# Altium PCB BLDC-Driver-v2.0.PcbDoc (part 4 of 6)
Units mil, origin at the board's own origin, x right, y up, seen from the top; angles counter-clockwise.
Board outline 5905.51 x 4330.71 mil, 4 copper layers (Top Layer, Layer 1, Layer 2, Bottom Layer), stack 62.047 mil thick; 284 components, 198 nets, 819 pads, 521 vias.
Unrouted connection lines stored in the file: 1.
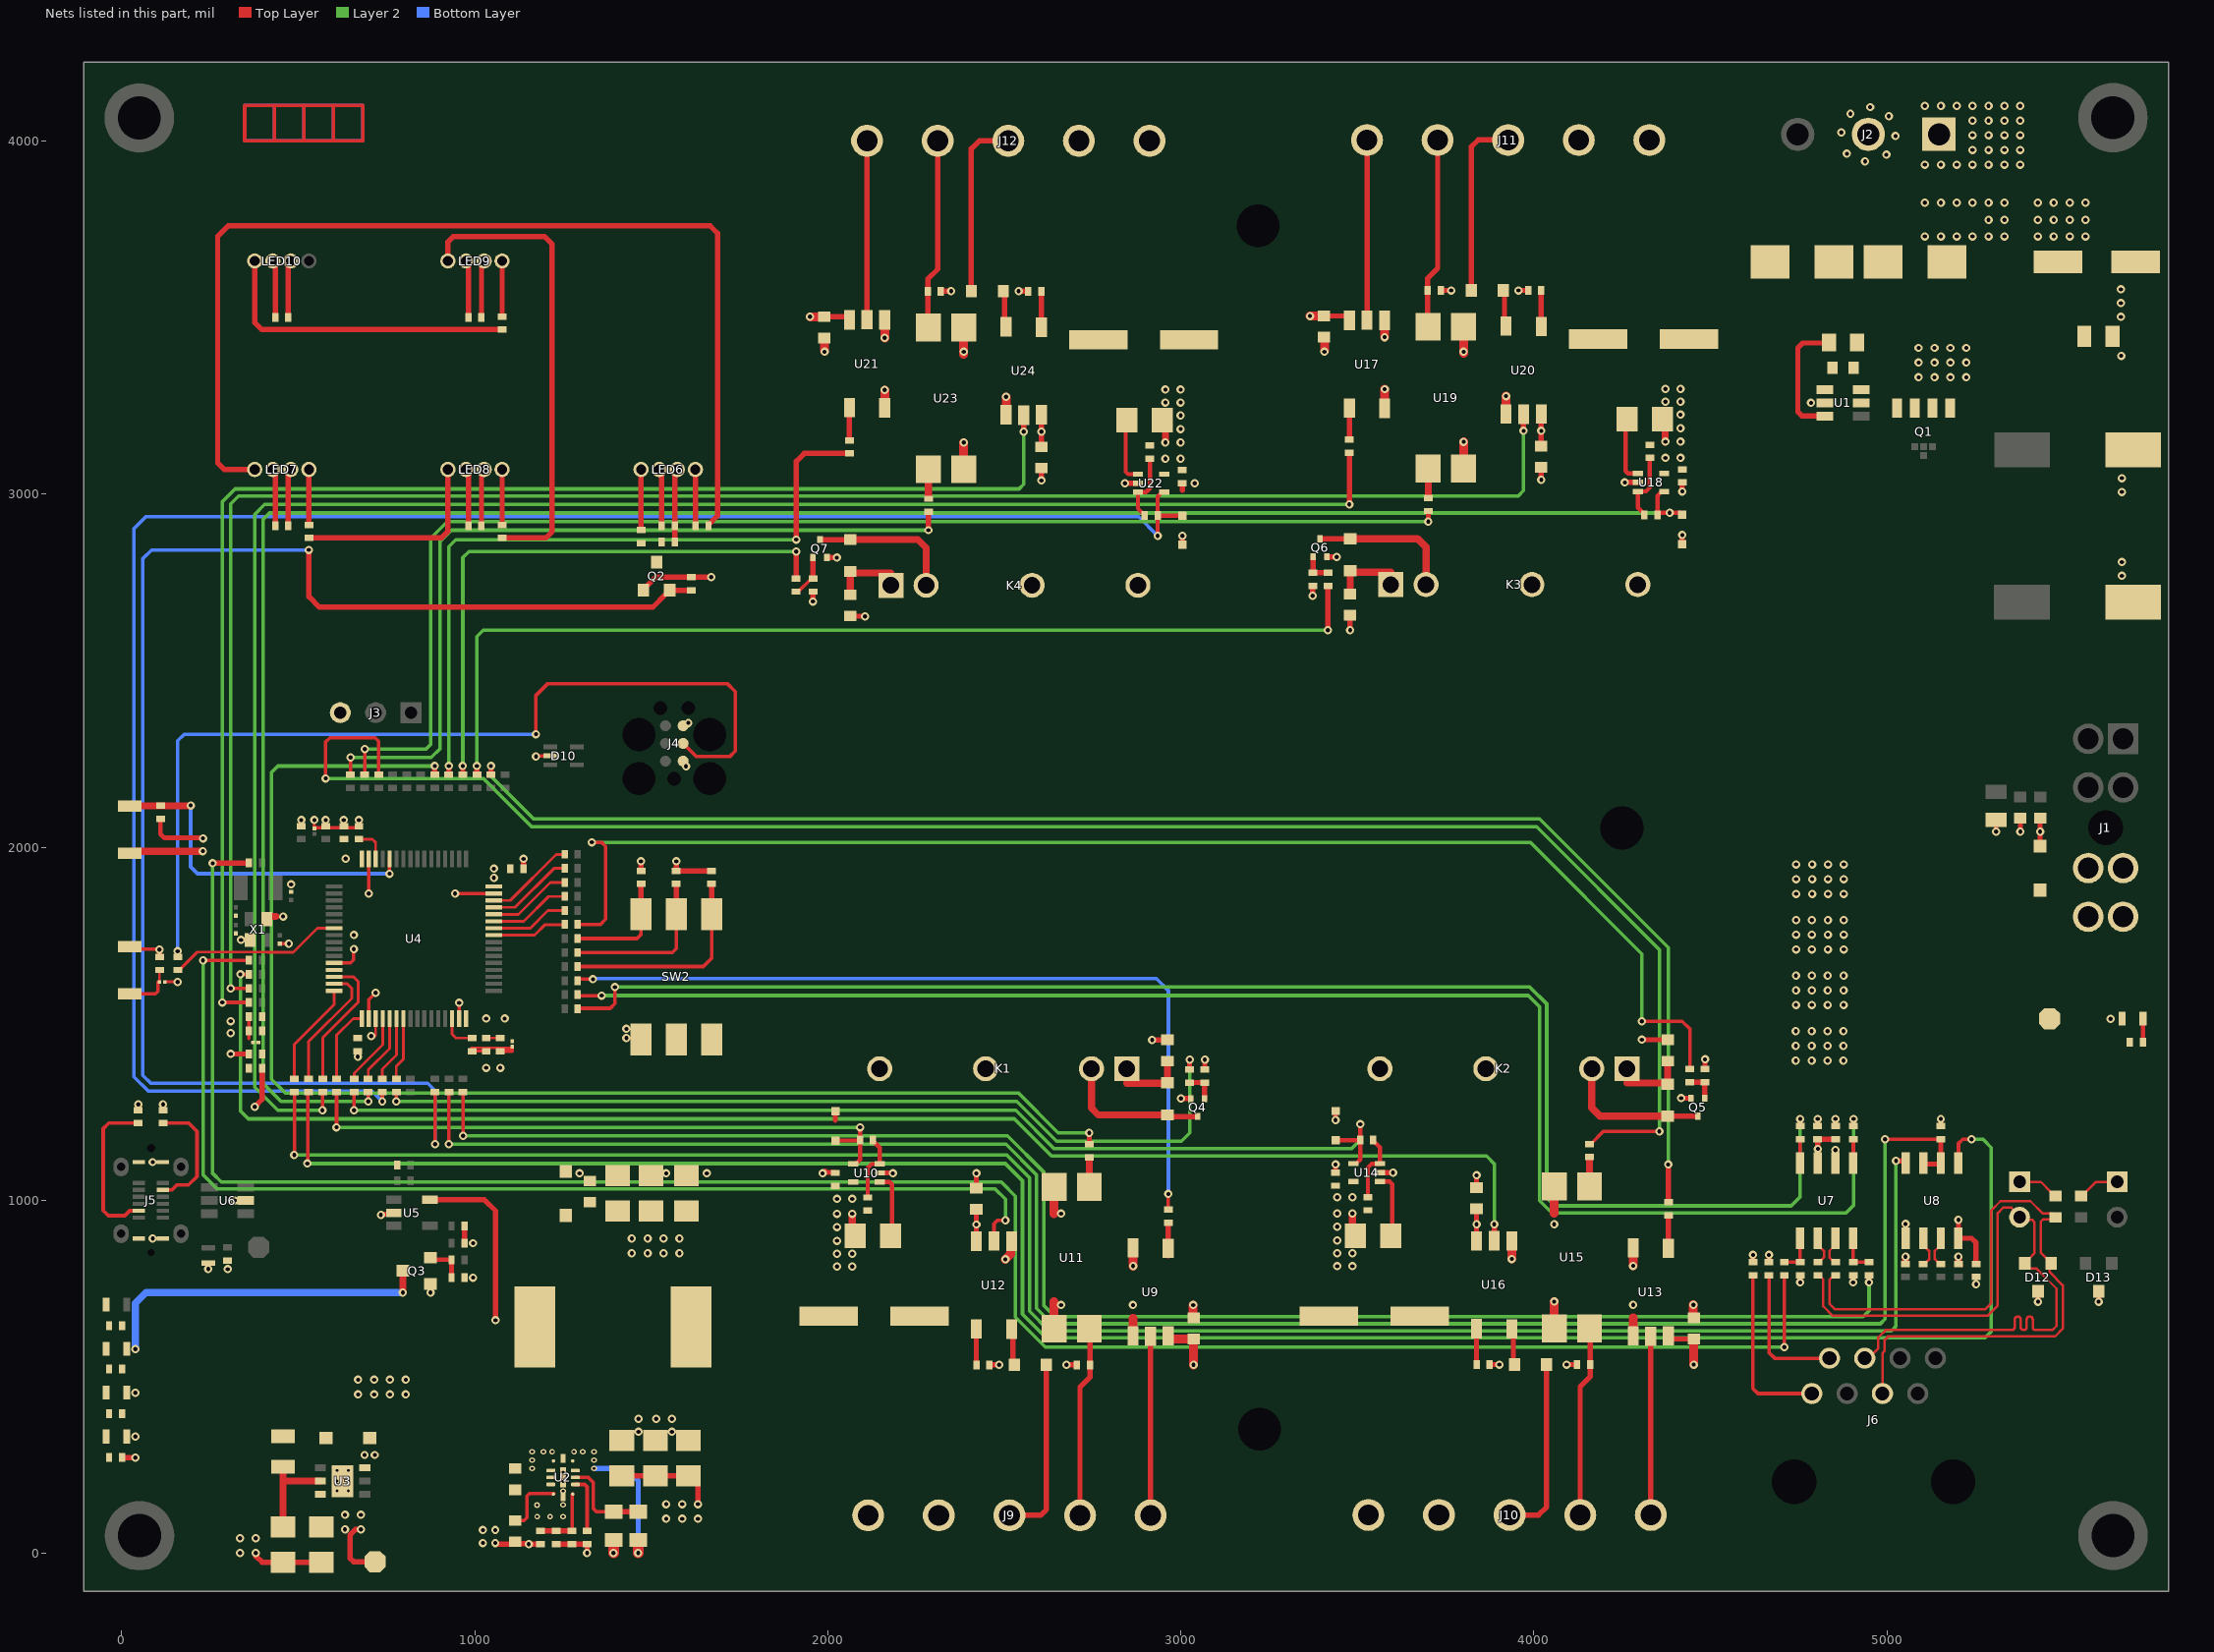
[diagram p4: the nets of this part, all layers, seen from the top]

## Part data (continued)
R70 R71: library part RC0402FR-075K1L, "RES 5.1K OHM 1% 1/16W 0402", Case Code (Imperial)=0402, Case Code (Metric)=1005, LCSC Part Number=C105872, Manufacturer=Yageo, Max Operating Temperature=155°C, Max Power Dissipation=63mW, Min Operating Temperature=-55°C, Package Quantity=1, Resistance=5.1kR, Resistance Tolerance=1%, Resistor Type="Thick Film", Temperature Coefficient=100ppm/°C, Voltage Rating=50V, Case/Package=0402, Category="Chip SMD Resistors", ComponentLink1Description=https://datasheet.ciiva.com/7983/1018594-7983519.pdf?src-supplier=Element14, ComponentLink1URL=https://datasheet.ciiva.com/7983/1018594-7983519.pdf?src-supplier=Element14, ComponentLink2Description=https://datasheet.ciiva.com/46394/1018594-46394936.pdf?src-supplier=Element14, ComponentLink2URL=https://datasheet.ciiva.com/46394/1018594-46394936.pdf?src-supplier=Element14, ComponentLink3Description=https://datasheet.ciiva.com/2453/pyu-r-int-thick-7-2453401.pdf?src-supplier=Digi-Key, ComponentLink3URL=https://datasheet.ciiva.com/2453/pyu-r-int-thick-7-2453401.pdf?src-supplier=Digi-Key, ComponentLink4Description=https://datasheet.ciiva.com/2453/pyu-r-int-thick-7-2453402.pdf?src-supplier=Digi-Key, ComponentLink4URL=https://datasheet.ciiva.com/2453/pyu-r-int-thick-7-2453402.pdf?src-supplier=Digi-Key, ComponentLink5Description=https://datasheet.ciiva.com/2453/pyu-r-int-thick-7-2453400.pdf?src-supplier=Digi-Key, ComponentLink5URL=https://datasheet.ciiva.com/2453/pyu-r-int-thick-7-2453400.pdf?src-supplier=Digi-Key, ComponentLink6Description=https://datasheet.ciiva.com/12558/pyu-rc0402-51-rohs-l-6-r-8721-12558460.pdf?src-supplier=Mouser, ComponentLink6URL=https://datasheet.ciiva.com/12558/pyu-rc0402-51-rohs-l-6-r-8721-12558460.pdf?src-supplier=Mouser, ComponentLink7Description=https://datasheet.ciiva.com/16744/pyu-rc0402-51-rohs-l-6-r-16744283.pdf?src-supplier=Future+Electronics, ComponentLink7URL=https://datasheet.ciiva.com/16744/pyu-rc0402-51-rohs-l-6-r-16744283.pdf?src-supplier=Future+Electronics, ComponentLink8Description=https://datasheet.ciiva.com/15189/getdatasheetpartid-323636-15189493.pdf?src-supplier=Verical, ComponentLink8URL=https://datasheet.ciiva.com/15189/getdatasheetpartid-323636-15189493.pdf?src-supplier=Verical, Construction=Rectangular, Depth=0.5mm, Features="Moisture Resistant", Height=0.016inch, Item Type=Resistor, Lead Free="Lead Free", Length=1mm, Manufacturer Part Number=RC0402FR-075K1L, Military Standard=Not, Number of Terminations=2, Packaging="Tape and Reel", Power Rating=63mW, Pricing 1="10000=0.00085 (USD)", RoHS=Yes, RoHS Compliant=Yes, Series=RC, Stock 1=65000, Supplier 1=Avnet, Supplier Part Number 1=RC0402FR-075K1L, Technology="THICK FILM", Termination=SMD/SMT, Tolerance=1%, Voltage Rating (DC)=50V, Width=0.02inch, Working Voltage=50V
R81 R86: library part RC0603FR-07120RL, "RES 120 OHM 1% 1/10W 0603", Case Code (Imperial)=0603, Case Code (Metric)=1608, LCSC Part Number=C114640, Manufacturer=Yageo, Max Operating Temperature=155°C, Max Power Dissipation=100mW, Min Operating Temperature=-55°C, Package Quantity=1, Resistance Tolerance=1%, Resistor Type="Thick Film", Supplier Part Number 1=311-120HRCT-ND, Temperature Coefficient=100ppm/°C, Voltage Rating=50V, Case/Package=0603, Category="Chip SMD Resistors", ComponentLink1Description=https://datasheet.ciiva.com/2553/pyu-r-int-thick-7-2553512.pdf?src-supplier=Digi-Key, ComponentLink1URL=https://datasheet.ciiva.com/2553/pyu-r-int-thick-7-2553512.pdf?src-supplier=Digi-Key, ComponentLink2Description=https://datasheet.ciiva.com/7746/443971-7746248.pdf?src-supplier=Element14, ComponentLink2URL=https://datasheet.ciiva.com/7746/443971-7746248.pdf?src-supplier=Element14, ComponentLink3Description=https://datasheet.ciiva.com/2553/pyu-r-int-thick-7-2553513.pdf?src-supplier=Digi-Key, ComponentLink3URL=https://datasheet.ciiva.com/2553/pyu-r-int-thick-7-2553513.pdf?src-supplier=Digi-Key, ComponentLink4Description=https://datasheet.ciiva.com/7746/443971-7746249.pdf?src-supplier=Element14, ComponentLink4URL=https://datasheet.ciiva.com/7746/443971-7746249.pdf?src-supplier=Element14, ComponentLink5Description=https://datasheet.ciiva.com/2553/pyu-r-int-thick-7-2553514.pdf?src-supplier=Digi-Key, ComponentLink5URL=https://datasheet.ciiva.com/2553/pyu-r-int-thick-7-2553514.pdf?src-supplier=Digi-Key, ComponentLink6Description=https://datasheet.ciiva.com/46395/443971-46395021.pdf?src-supplier=Element14, ComponentLink6URL=https://datasheet.ciiva.com/46395/443971-46395021.pdf?src-supplier=Element14, Construction=Rectangular, Depth=0.8mm, Features="Moisture Resistant", Height=0.022inch, Item Type=Resistor, Lead Free="Lead Free", Length=1.6mm, Manufacturer Part Number=RC0603FR-07120RL, Military Standard=Not, Number of Pins=2, Number of Terminations=2, Packaging="Tape and Reel", Power Rating=100mW, Pricing 1="1=0.10000, 10=0.02400, 100=0.00970, 1000=0.00436, 2500=0.00378 (USD)", REACH SVHC="No SVHC", Resistance=120R, RoHS=Yes, RoHS Compliant=Yes, Series=RC, Size Code=0603, Stock 1=839061, Supplier 1=Digi-Key, Termination=SMD/SMT, Tolerance=1%, Voltage Rating (DC)=50V, Width=0.031inch
R91 R94 R100 R103 R109 R112 R118 R121: library part RC0402FR-07470RL, "RES 470 OHM 1% 1/16W 0402", Case Code (Imperial)=0402, Case Code (Metric)=1005, LCSC Part Number=C114877, Manufacturer=Yageo, Max Operating Temperature=155°C, Max Power Dissipation=63mW, Min Operating Temperature=-55°C, Package Quantity=1, Power Rating=62.5mW, Resistance Tolerance=1%, Resistor Type="Thick Film", Temperature Coefficient=100ppm/°C, Voltage Rating=50V, Case/Package=0402, ComponentLink1Description=https://datasheet.ciiva.com/46412/1018594-46412838.pdf?src-supplier=Element14, ComponentLink1URL=https://datasheet.ciiva.com/46412/1018594-46412838.pdf?src-supplier=Element14, ComponentLink2Description=https://datasheet.ciiva.com/2453/pyu-r-int-thick-7-2453377.pdf?src-supplier=Digikey, ComponentLink2URL=https://datasheet.ciiva.com/2453/pyu-r-int-thick-7-2453377.pdf?src-supplier=Digikey, ComponentLink3Description=https://datasheet.ciiva.com/2453/pyu-r-int-thick-7-2453378.pdf?src-supplier=Digikey, ComponentLink3URL=https://datasheet.ciiva.com/2453/pyu-r-int-thick-7-2453378.pdf?src-supplier=Digikey, ComponentLink4Description=https://datasheet.ciiva.com/2453/pyu-r-int-thick-7-2453376.pdf?src-supplier=Digikey, ComponentLink4URL=https://datasheet.ciiva.com/2453/pyu-r-int-thick-7-2453376.pdf?src-supplier=Digikey, ComponentLink5Description=https://datasheet.ciiva.com/7850/1018594-7850015.pdf?src-supplier=Element14, ComponentLink5URL=https://datasheet.ciiva.com/7850/1018594-7850015.pdf?src-supplier=Element14, ComponentLink6Description=https://datasheet.ciiva.com/7850/1018594-7850014.pdf?src-supplier=Element14, ComponentLink6URL=https://datasheet.ciiva.com/7850/1018594-7850014.pdf?src-supplier=Element14, ComponentLink7Description=https://datasheet.ciiva.com/15189/getdatasheetpartid-330246-15189463.pdf?src-supplier=Verical, ComponentLink7URL=https://datasheet.ciiva.com/15189/getdatasheetpartid-330246-15189463.pdf?src-supplier=Verical, Construction=Rectangular, Depth=0.5mm, Features="Moisture Resistant", Height=0.016inch, Item Type=Resistor, Lead Free="Lead Free", Length=1mm, Manufacturer Part Number=RC0402FR-07470RL, Military Standard=Not, Number of Terminations=2, Packaging="Tape and Reel", Pricing="10000=0.00085 (USD)", Reach SVHC Compliant=No, RoHS=Yes, RoHS Compliant=Yes, Series=RC, Stock=10000, Supplier=Avnet, Supplier Part Number=RC0402FR-07470RL, Termination=SMD/SMT, Tolerance=1%, Voltage Rating (AC)=50V, Width=0.02inch, Working Voltage=50V
R93 R102 R111 R120: library part LR1206-21R040F4, "1W 40mΩ Surface Mount Current Sensing Resistors ±50ppm/℃ ±1% 1206 Current Sense Resistors/Shunt Resistors ROHS", LCSC Part Number=C2681030, Manufacturer=RALEC, Package=1206, ComponentLink1Description=LCSC, ComponentLink1URL=https://www.lcsc.com/product-detail/Current-Sense-Resistors-Shunt-Resistors_RALEC-LR1206-21R040F4_C2681030.html, Item Type=Resistor, Manufacturer Part Number=LR1206-21R040F4
R95 R104 R113 R122: library part RT0402BRD0736KL, "RES SMD 36K OHM 0.1% 1/16W 0402", Case Code (Imperial)=0402, Case Code (Metric)=1005, LCSC Part Number=C852742, Manufacturer=Yageo, Max Operating Temperature=155°C, Max Power Dissipation=63mW, Min Operating Temperature=-55°C, Power Rating=62.5mW, Temperature Coefficient=25ppm/°C, Tolerance=0.1%, Voltage Rating=50V, Case/Package=0402, Category="Chip SMD Resistors", ComponentLink1Description=https://datasheet.ciiva.com/12722/pyu-rt-1-to-0-05-rohs-l-4-12722329.pdf?src-supplier=Mouser, ComponentLink1URL=https://datasheet.ciiva.com/12722/pyu-rt-1-to-0-05-rohs-l-4-12722329.pdf?src-supplier=Mouser, Features="Moisture Resistant", Height=0.014inch, Item Type=Resistor, Lead Free="Lead Free", Length=0.039inch, Manufacturer Part Number=RT0402BRD0736KL, Number of Terminations=2, Packaging="Tape and Reel", Pricing="1=0.3205, 10=0.2411, 25=0.2387, 100=0.1111, 250=0.1093, 500=0.0738, 1000=0.0507, 3000=0.0463, 6000=0.0439 (USD)", RoHS=Yes, RoHS Compliant=Yes, Series=RT, Stock=6118, Supplier="Arrow Electronics", Supplier Part Number=RT0402BRD0736KL, Termination=SMD/SMT, Voltage Rating (DC)=50V, Width=0.02inch
R97 R106 R115 R124: library part RC0402FR-07680RL, "RES 680 OHM 1% 1/16W 0402", Case Code (Imperial)=0402, Case Code (Metric)=1005, Manufacturer=Yageo, Max Operating Temperature=155°C, Max Power Dissipation=63mW, Min Operating Temperature=-55°C, Resistance Tolerance=1%, Resistor Type="Thick Film", Supplier Part Number 1=7948052, Temperature Coefficient=100ppm/°C, Voltage Rating=50V, Case/Package=0402, Category="Chip SMD Resistors", ComponentLink1Description=https://datasheet.ciiva.com/12667/pyu-rc0402-51-rohs-l-6-r-12667916.pdf?src-supplier=Mouser, ComponentLink1URL=https://datasheet.ciiva.com/12667/pyu-rc0402-51-rohs-l-6-r-12667916.pdf?src-supplier=Mouser, ComponentLink2Description=https://datasheet.ciiva.com/7850/1018594-7850071.pdf?src-supplier=Element14, ComponentLink2URL=https://datasheet.ciiva.com/7850/1018594-7850071.pdf?src-supplier=Element14, ComponentLink3Description=https://datasheet.ciiva.com/7850/1018594-7850070.pdf?src-supplier=Element14, ComponentLink3URL=https://datasheet.ciiva.com/7850/1018594-7850070.pdf?src-supplier=Element14, ComponentLink4Description=https://datasheet.ciiva.com/17042/pyu-rc0402-51-rohs-l-6-r-17042399.pdf?src-supplier=Future+Electronics, ComponentLink4URL=https://datasheet.ciiva.com/17042/pyu-rc0402-51-rohs-l-6-r-17042399.pdf?src-supplier=Future+Electronics, Construction=Rectangular, Depth=0.5mm, Features="Moisture Resistant", Item Type=Resistor, Lead Free="Lead Free", Length=1mm, Manufacturer Part Number=RC0402FR-07680RL, Military Standard=Not, Number of Terminations=2, Packaging="Tape and Reel", Power Rating=63mW, Pricing 1="10000=0.0011, 100000=0.0011, 300000=0.001, 750000=0.001, 2000000=0.0009 (USD)", Reach SVHC Compliant=No, Resistance=680R, RoHS=Yes, RoHS Compliant=Yes, Series=RC, Size Code=0402, Stock 1=5080000, Supplier 1="Future Electronics", Termination=SMD/SMT, Tolerance=1%, Voltage Rating (AC)=50V
R99 R108 R117 R126: library part RT0402BRD071K65L, "RES SMD 1.65KOHM 0.1% 1/16W 0402", LCSC Part Number=C852615, Manufacturer=Yageo, ComponentLink1Description=https://datasheet.ciiva.com/2582/pyu-rt-1-to-0-05-rohs-l-5-2582209.pdf?src-supplier=Digikey, ComponentLink1URL=https://datasheet.ciiva.com/2582/pyu-rt-1-to-0-05-rohs-l-5-2582209.pdf?src-supplier=Digikey, Item Type=Resistors, Manufacturer Part Number=RT0402BRD071K65L, Pricing="10000=0.0185, 20000=0.0182, 30000=0.0181, 40000=0.018, 50000=0.0176 (USD)", RoHS=Yes, Stock=10000, Supplier="Future Electronics"
R127 R128: library part RC0402FR-07560RL, "RES 560 OHM 1% 1/16W 0402", Case Code (Imperial)=0402, Case Code (Metric)=1005, LCSC Part Number=C163460, Manufacturer=Yageo, Max Operating Temperature=155°C, Max Power Dissipation=63mW, Min Operating Temperature=-55°C, Package Quantity=1, Resistance Tolerance=1%, Resistor Type="Thick Film", Supplier Part Number=8872046, Temperature Coefficient=100ppm/°C, Voltage Rating=50V, Case/Package=0402, Category="Chip SMD Resistors", ComponentLink1Description=https://datasheet.ciiva.com/2453/pyu-r-int-thick-7-2453458.pdf?src-supplier=Digikey, ComponentLink1URL=https://datasheet.ciiva.com/2453/pyu-r-int-thick-7-2453458.pdf?src-supplier=Digikey, ComponentLink2Description=https://datasheet.ciiva.com/2453/pyu-r-int-thick-7-2453459.pdf?src-supplier=Digikey, ComponentLink2URL=https://datasheet.ciiva.com/2453/pyu-r-int-thick-7-2453459.pdf?src-supplier=Digikey, ComponentLink3Description=https://datasheet.ciiva.com/2453/pyu-r-int-thick-7-2453457.pdf?src-supplier=Digikey, ComponentLink3URL=https://datasheet.ciiva.com/2453/pyu-r-int-thick-7-2453457.pdf?src-supplier=Digikey, ComponentLink4Description=https://datasheet.ciiva.com/12558/pyu-rc0402-51-rohs-l-6-r-8721-12558383.pdf?src-supplier=Mouser, ComponentLink4URL=https://datasheet.ciiva.com/12558/pyu-rc0402-51-rohs-l-6-r-8721-12558383.pdf?src-supplier=Mouser, ComponentLink5Description=https://datasheet.ciiva.com/7850/1018594-7850042.pdf?src-supplier=Element14, ComponentLink5URL=https://datasheet.ciiva.com/7850/1018594-7850042.pdf?src-supplier=Element14, ComponentLink6Description=https://datasheet.ciiva.com/7850/1018594-7850043.pdf?src-supplier=Element14, ComponentLink6URL=https://datasheet.ciiva.com/7850/1018594-7850043.pdf?src-supplier=Element14, Construction=Rectangular, Depth=0.5mm, Features="Moisture Resistant", Height=0.016inch, Item Type=Resistor, Lead Free="Lead Free", Length=1mm, Manufacturer Part Number=RC0402FR-07560RL, Military Standard=Not, Number of Terminations=2, Packaging="Tape and Reel", Power Rating=63mW, Pricing="10000=0.0012, 100000=0.0011, 300000=0.0011, 1250000=0.001, 3000000=0.0009 (USD)", Reach SVHC Compliant=Unknown, RoHS=Yes, RoHS Compliant=Yes, Series=RC, Stock=1360000, Supplier="Future Electronics", Termination=SMD/SMT, Tolerance=1%, Width=0.02inch
SW1 SW3: "SWITCH TACTILE SPST-NO 0.05A 12V", Contact Current Rating=50mA, Contact Resistance=100mR, Insulation Resistance=100MR, LCSC Part Number=C231329, Manufacturer=Omron, Max Operating Temperature=70°C, Max Voltage Rating (DC)=12V, Min Operating Temperature=-25°C, Operating Force=1.5N, Package Quantity=1, Ratings="Dust Proof,IP40", Supplier Part Number 1=SW1020DKR-ND, Actuator Length=0.4mm, Actuator Type=Standard, ComponentLink1Description=http://www.farnell.com/datasheets/60838.pdf?src-supplier=Farnell, ComponentLink1URL=http://www.farnell.com/datasheets/60838.pdf?src-supplier=Farnell, ComponentLink2Description=http://www.farnell.com/datasheets/60838.pdf?src-supplier=Element14, ComponentLink2URL=http://www.farnell.com/datasheets/60838.pdf?src-supplier=Element14, ComponentLink3Description=https://omronfs.omron.com/en_US/ecb/products/pdf/en-b3u.pdf?src-supplier=Digi-Key, ComponentLink3URL=https://omronfs.omron.com/en_US/ecb/products/pdf/en-b3u.pdf?src-supplier=Digi-Key, ComponentLink4Description=http://www.omron.com/ecb/products/pdf/en-b3u.pdf?src-supplier=Digi-Key, ComponentLink4URL=http://www.omron.com/ecb/products/pdf/en-b3u.pdf?src-supplier=Digi-Key, ComponentLink5Description=https://www.distrelec.biz/Web/Downloads/he/et/B3U_eng_datasheet.pdf?mime=application%2Fpdf&src-supplier=Distrelec, ComponentLink5URL=https://www.distrelec.biz/Web/Downloads/he/et/B3U_eng_datasheet.pdf?mime=application%2Fpdf&src-supplier=Distrelec, ComponentLink6Description=http://www.onlinecomponents.com/productFiles/mf-OM/en-b3u.pdf?src-supplier=Onlinecomponents.com, ComponentLink6URL=http://www.onlinecomponents.com/productFiles/mf-OM/en-b3u.pdf?src-supplier=Onlinecomponents.com, ComponentLink7Description=https://www.verical.com/server-webapp/html/getDatasheet?partID=552554&src-supplier=Verical, ComponentLink7URL=https://www.verical.com/server-webapp/html/getDatasheet?partID=552554&src-supplier=Verical, ComponentLink8Description=http://www.farnell.com/datasheets/1685550.pdf?src-supplier=Element14, ComponentLink8URL=http://www.farnell.com/datasheets/1685550.pdf?src-supplier=Element14, ComponentLink9Description=http://www.farnell.com/datasheets/2610940.pdf?src-supplier=Farnell, ComponentLink9URL=http://www.farnell.com/datasheets/2610940.pdf?src-supplier=Farnell, ComponentLink10Description=https://www.alliedelec.com/m/d/4c8a9ef82804fc3c241a13c1e298fd73.pdf?src-supplier=Allied+Electronics, ComponentLink10URL=https://www.alliedelec.com/m/d/4c8a9ef82804fc3c241a13c1e298fd73.pdf?src-supplier=Allied+Electronics, Contact Material=Silver, Current Rating=50mA, Depth=2.5mm, Electrical Life=200000Cycles, Height=1.2mm, Illumination Type=Non-Illuminated,Illuminated, Item Type=Switch, Lead Free="Lead Free", Length=4mm, Manufacturer Part Number=B3U-1000P, Max Current Rating=50mA, Mechanical Life=200000Cycles, Mount="Surface Mount", Orientation=Straight, Packaging="Tape and Reel", Pricing 1="1=1, 10=0.961, 25=0.9064, 50=0.7976, 100=0.7251, 250=0.68888, 500=0.67074, 1000=0.52571 (USD)", REACH SVHC=Unknown, Stock 1=116454, Supplier 1=Digi-Key, Switch Function=Off-Mom, Switch Travel=0.15mm, Termination=SMD/SMT, Throw Configuration=SPST, Voltage Rating (DC)=12V, Weight=0.000776oz, Width=3mm
SW2: "3 positions SPST Black Flat Toggle, Raised Style SMD-6P,6x7.6mm DIP Switches ROHS", LCSC Part Number=C57453, Manufacturer="DongGuan KINGTEK Industrial Co.,LTD", Package=SMD-6P,6x7.6mm, ComponentLink1Description=LCSC, ComponentLink1URL=https://www.lcsc.com/product-detail/DIP-Switches_DongGuan-KINGTEK-Industrial-Co-LTD-DSIC03LSGET_C57453.html, Item Type="DIP Switches", Manufacturer Part Number=DSIC03LSGET
TP1 TP2 TP3: "Test Point ON", Item Type="TEST POINT"
U1: "OR Controller N+1 ORing Controller N-Channel 1:1 SOT-23-6", Case/Package=SOT-23-6, LCSC Part Number=C2941042, Manufacturer="Texas Instruments", Max Operating Temperature=125°C, Max Output current=5A, Max Supply Voltage=65V, Min Operating Temperature=-40°C, Min Supply Voltage=3.2V, Nominal Supply Current=80uA, Supplier Part Number=595-LM74700QDBVRQ1, Category="Power Management ICs", ComponentLink1Description=http://www.ti.com/general/docs/suppproductinfo.tsp?distId=10&amp;gotoUrl=http%3A%2F%2Fwww.ti.com%2Flit%2Fgpn%2Flm74700-q1&src-supplier=Digikey, ComponentLink1URL=http://www.ti.com/general/docs/suppproductinfo.tsp?distId=10&amp;gotoUrl=http%3A%2F%2Fwww.ti.com%2Flit%2Fgpn%2Flm74700-q1&src-supplier=Digikey, Height=1.45mm, Item Type=IC, Length=2.9mm, Manufacturer Part Number=LM74700QDBVRQ1, Mounting Technology="Surface Mount", Number of Outputs=1NUMBER, Pins=6NUMBER, Pricing="1=1.78, 10=1.6, 50=1.6, 100=1.28, 1000=0.877, 10000=0.756 (USD)", RoHS=Yes, RoHS Compliant=Yes, Series="Automotive, AEC-Q100", Stock=11505, Supplier=Mouser, Thickness=1.2mm, Turn-Off Delay Time=450ns, Turn-On Delay Time=1.4us, Width=1.6mm
U2: "IC REG BUCK ADJ 4A 13WQFN", LCSC Part Number=C3187981, Manufacturer="Texas Instruments", Item Type=IC, Manufacturer Part Number=LM60440AQRPKRQ1, Pricing="1=2.79, 10=1.91, 50=1.91, 100=1.71, 1000=1.52, 10000=1.45 (USD)", RoHS=Yes, Stock=916, Supplier=Mouser
U3: "IC REG LINEAR 3.3V 1.3A 6DFN", LCSC Part Number=C283488, Manufacturer=STMicroelectronics, ComponentLink1Description=https://datasheet.ciiva.com/2053/cd00186925-2053848.pdf?src-supplier=Digikey, ComponentLink1URL=https://datasheet.ciiva.com/2053/cd00186925-2053848.pdf?src-supplier=Digikey, ComponentLink2Description=https://datasheet.ciiva.com/2053/cd00186925-2053849.pdf?src-supplier=Digikey, ComponentLink2URL=https://datasheet.ciiva.com/2053/cd00186925-2053849.pdf?src-supplier=Digikey, ComponentLink3Description=https://datasheet.ciiva.com/2053/cd00186925-2053850.pdf?src-supplier=Digikey, ComponentLink3URL=https://datasheet.ciiva.com/2053/cd00186925-2053850.pdf?src-supplier=Digikey, ComponentLink4Description=https://datasheet.ciiva.com/16489/cd00186925-16489850.pdf?src-supplier=Future+Electronics, ComponentLink4URL=https://datasheet.ciiva.com/16489/cd00186925-16489850.pdf?src-supplier=Future+Electronics, Item Type=IC, Manufacturer Part Number=ST1L05APU33R, Pricing="1=1.06, 10=0.766, 25=0.692, 100=0.6103, 250=0.57136, 500=0.5479, 1000=0.5286 (USD)", RoHS=Yes, Stock=7599, Supplier=Digikey
U4: "IC MCU 32BIT 128KB FLASH 64LQFP", LCSC Part Number=C6807804, Manufacturer=STMicroelectronics, Item Type=IC, Manufacturer Part Number=STM32H503RBT6, Pricing="1=3.75, 10=2.6, 50=2.6, 100=2.28, 1000=2.09, 10000=1.98 (USD)", RoHS=No, Stock=991, Supplier=Mouser
U5: "IC PWR SWITCH N-CHAN 1:1 SOT23-5", Drain to Source Resistance=90mR, LCSC Part Number=C361034, Manufacturer=STMicroelectronics, Max Supply Voltage=5.5V, Min Supply Voltage=2.7V, Nominal Supply Voltage=5V, ComponentLink1Description=https://datasheet.ciiva.com/4923/cd00167470-116695-4923505.pdf?src-supplier=Mouser, ComponentLink1URL=https://datasheet.ciiva.com/4923/cd00167470-116695-4923505.pdf?src-supplier=Mouser, ComponentLink2Description=https://datasheet.ciiva.com/15108/getdatasheetpartid-66027-15108935.pdf?src-supplier=Verical, ComponentLink2URL=https://datasheet.ciiva.com/15108/getdatasheetpartid-66027-15108935.pdf?src-supplier=Verical, ComponentLink3Description=https://datasheet.ciiva.com/1962/cd00167470-1962487.pdf?src-supplier=Digikey, ComponentLink3URL=https://datasheet.ciiva.com/1962/cd00167470-1962487.pdf?src-supplier=Digikey, ComponentLink4Description=https://datasheet.ciiva.com/1962/cd00167470-1962488.pdf?src-supplier=Digikey, ComponentLink4URL=https://datasheet.ciiva.com/1962/cd00167470-1962488.pdf?src-supplier=Digikey, ComponentLink5Description=https://datasheet.ciiva.com/1962/cd00167470-1962489.pdf?src-supplier=Digikey, ComponentLink5URL=https://datasheet.ciiva.com/1962/cd00167470-1962489.pdf?src-supplier=Digikey, ComponentLink6Description=https://datasheet.ciiva.com/1512/1700527-1512630.pdf?src-supplier=Element14, ComponentLink6URL=https://datasheet.ciiva.com/1512/1700527-1512630.pdf?src-supplier=Element14, ComponentLink7Description=https://datasheet.ciiva.com/16491/cd00167470-16491224.pdf?src-supplier=Future+Electronics, ComponentLink7URL=https://datasheet.ciiva.com/16491/cd00167470-16491224.pdf?src-supplier=Future+Electronics, ComponentLink8Description=https://datasheet.ciiva.com/41457/001185713-da-01-en-ic-pwr-switch-stmps2161str-sot-23-5-stm-41457482.pdf?src-supplier=Conrad, ComponentLink8URL=https://datasheet.ciiva.com/41457/001185713-da-01-en-ic-pwr-switch-stmps2161str-sot-23-5-stm-41457482.pdf?src-supplier=Conrad, Height=1.45mm, Item Type=IC, Manufacturer Part Number=STMPS2161STR, Number of Channels=1NUMBER, Output Voltage=5V, Pricing="3000=0.42, 6000=0.41, 9000=0.405, 12000=0.405, 15000=0.395 (USD)", RoHS=Yes, Stock=3000, Supplier="Future Electronics"
U6: "6A 12V 150W 6V Unidirectional 5V SOT-23-6 ESD and Surge Protection (TVS/ESD) ROHS", LCSC Part Number=C2827654, Manufacturer="TECH PUBLIC", Package=SOT-23-6, ComponentLink1Description=LCSC, ComponentLink1URL=https://www.lcsc.com/product-detail/ESD-and-Surge-Protection-TVS-ESD_TECH-PUBLIC-USBLC6-2SC6_C2827654.html, Item Type=(TVS/ESD), Manufacturer Part Number=USBLC6-2SC6
U7: "IC TRANSCEIVER HALF 1/1 8SOIC", Case/Package=SOIC, LCSC Part Number=C22396693, Manufacturer="Texas Instruments", Height=1.75mm, Item Type=IC, Length=4.9mm, Manufacturer Part Number=TCAN3414DR, Pins=8, Pricing="1=1.55, 10=1.1, 50=1.1, 100=0.895, 1000=0.763, 10000=0.681 (USD)", RoHS=No, Stock=201, Supplier=Mouser, Thickness=1.58mm, Width=3.91mm
U8: "IC TRANSCEIVER HALF 1/1 8SOIC", LCSC Part Number=C3235059, Manufacturer="Texas Instruments", Item Type=IC, Manufacturer Part Number=THVD1449DR, Pricing="1=3.62, 10=2.51, 50=2.51, 100=2.27, 1000=2.02, 10000=1.95 (USD)", RoHS=No, Stock=7454, Supplier=Mouser
U9 U12 U13 U16 U17 U20 U21 U24: "15Mbit/s 80ns 2.7V~5.5V 20kV/us DC SO-5 Logic Output Optoisolators ROHS", LCSC Part Number=C107626, Manufacturer=Toshiba, ComponentLink1Description=https://datasheet.octopart.com/TLP2361%28TPL%2CE%28T-Toshiba-datasheet-62094047.pdf?src-supplier=TME, ComponentLink1URL=https://datasheet.octopart.com/TLP2361%28TPL%2CE%28T-Toshiba-datasheet-62094047.pdf?src-supplier=TME, Item Type=Optoisolator, Manufacturer Part Number=TLP2361(TPL,E(T, Pricing="3000=0.3233, 6000=0.3199, 9000=0.3167, 12000=0.3136, 15000=0.3102, 30000=0.3071 (USD)", RoHS=No, Stock=15000, Supplier="Arrow Electronics"
U10 U14 U18 U22: "IC CMOS 1 CIRCUIT SC70-5", Input Bias Current=5pA, Input Offset Voltage (Vos)=400uV, LCSC Part Number=C398362, Manufacturer="Texas Instruments", Max Operating Temperature=125°C, Min Operating Temperature=-40°C, Operating Supply Current=60uA, Output Current per Channel=40mA, Supplier Part Number=595-TLV9001IDCKR, ComponentLink1Description=http://www.ti.com/lit/ds/symlink/tlv9001.pdf?src-supplier=Digikey, ComponentLink1URL=http://www.ti.com/lit/ds/symlink/tlv9001.pdf?src-supplier=Digikey, Gain Bandwidth Product=1MHz, Item Type=IC, Manufacturer Part Number=TLV9001IDCKR, Mounting Technology="Surface Mount", Number of Channels=1, Number of Circuits=1, Packaging="Cut Tape", Pricing="1=0.47, 10=0.348, 50=0.348, 100=0.194, 1000=0.146, 10000=0.117 (USD)", RoHS=Yes, RoHS Compliant=Yes, Series=-, Slew Rate=2V/µs, Stock=13115, Supplier=Mouser
U11 U15 U19 U23: "70V 5kV 50mA 100mV@1mA,20mA 1 6V 1.2V DC SMD-4 Transistor Output Optocoupler ROHS", LCSC Part Number=C2936043, Manufacturer=Slkor, Package=SMD-4, ComponentLink1Description=LCSC, ComponentLink1URL=https://www.lcsc.com/product-detail/Transistor-Output-Optocoupler_Slkor-SLKORMICRO-Elec-PC817C_C2936043.html, Item Type=IC, Manufacturer Part Number=PC817C
X1: library part XL7EL89COI-111YLC-24M, "24MHz Surface Mount Crystal 12pF ±10ppm ±20ppm SMD2016-4P Crystals ROHS", LCSC Part Number=C22434877, Manufacturer=YXC, Package=SMD2016-4, ComponentLink1Description=LCSC, ComponentLink1URL=https://www.lcsc.com/product-detail/Crystals_YXC-Crystal-Oscillators-XL7EL89COI-111YLC-24M_C22434877.html, Item Type=Crystal, Manufacturer Part Number=XL7EL89COI-111YLC-24M
X2: library part NX3215SA-32.768K-STD-MUA-8, "CRYSTAL 32.7680KHZ 12.5PF SMD", Case/Package=SMD/SMT, ESR (Equivalent Series Resistance)=70kR, Frequency=32.768kHz, Frequency Tolerance=20ppm, LCSC Part Number=C156245, Load Capacitance=12.5pF, Manufacturer=NDK, Max Operating Temperature=85°C, Min Operating Temperature=-40°C, Package Quantity=1000, Supplier Part Number 1=644-1156-6-ND, ComponentLink1Description=https://media.digikey.com/pdf/Data%20Sheets/NDK%20PDFs/NX3215SA-32.768K-STD-MUA-8.pdf?src-supplier=Digi-Key, ComponentLink1URL=https://media.digikey.com/pdf/Data%20Sheets/NDK%20PDFs/NX3215SA-32.768K-STD-MUA-8.pdf?src-supplier=Digi-Key, ComponentLink2Description=http://www.ndk.com/images/products/catalog/c_NX3215SA-STD-MUA-14_e.pdf?src-supplier=Digi-Key, ComponentLink2URL=http://www.ndk.com/images/products/catalog/c_NX3215SA-STD-MUA-14_e.pdf?src-supplier=Digi-Key, Height=0.035inch, Lead Free="Lead Free", Length=0.126inch, Manufacturer Part Number=NX3215SA-32.768K-STD-MUA-8, Mount="Surface Mount", Number of Pins=2, Packaging="Tape and Reel", Pricing 1="1=0.68, 10=0.602, 50=0.5628, 100=0.4974, 500=0.47124, 1000=0.3927 (USD)", Stock 1=29951, Supplier 1=Digi-Key, Width=0.059inch

## Free pads (board coordinates)
  round 196.85 hole 122.05: MH1(49.93,4065.68) MH1(50.67,49.93) MH1(5640.49,4066.42) MH1(5640.85,50.3)
  round 0 hole 122.05: MH1(3219.3,3760.04) MH1(3223.26,351.51) MH1(4250,2055)

## Via types
v1: diameter 23.62, hole 11.81, Top Layer to Bottom Layer, tented both sides, 497 vias
v2: diameter 15.75, hole 7.87, Top Layer to Bottom Layer, 24 vias

## Nets (pads, with @x,y where several pads share a name; then routed paths per layer and width w, separated by ;. In a path a pad name is that pad's centre, name@x,y a point inside that pad or via, vN(x,y) a via of type N, cw(c..) or ccw(c..) an arc to the next point about the centre after c; other vN are vias at no path point)
3V3: C23.2 C24.2 C25.2 C26.2 C27.2 C37.2 C38.2 C40.2 C47.1 C49.1 C52.1 C54.1 C57.1 C59.1 C62.1 C64.1 D5.2 D6.2 F1.2 J4.1 Q2.1 R9.1 R10.1 R11.2 R32.2 R33.2 R34.2 R59.2 R62.2 R63.2 R64.2 R65.2 R72.2 R127.2 SW3.2 U4.19 U4.32 U4.48 U4.64 U7.3 U8.8 U10.5 U12.6 U14.5 U16.6 U18.5 U20.6 U22.5 U24.6 | length 1464.6
  Top Layer w8: v1@707.92,1459.59 711.42,1459.59 719.61,1467.78 U4.19@719.61,1514.71 ; C27.2@1032.6,1459.59 C23.2@1072.47,1459.59 ; R72.2@4904.66,787.78 R72.2@4904.71,787.82
  Top Layer w15: v1(308.96,1414.4) v1(308.96,1414.4) 360.86,1414.33 R11.2@360.92,1414.27 ; R63.2@971.5,878.62 R65.2@971.5,927.22 ; R32.2@1471.15,1933.22 v1(1471.15,1960.12) ; Q2.1@1477.69,2728.08 1477.69,2730.05 1512.33,2764.69 R59.2@1613.97,2764.69 v1@1670,2764.69 ; v1(1571.18,1960.15) R33.2@1571.15,1933.23 R34.2@1671.15,1933.22 ; v1(1670,2765) v1@1671,2766 ; U12.6@2420.97,883.82 v1(2420.97,931.38) 2420.97,974.03 C49.1@2421.64,974.7 ; C64.1@2604.6,3133.86 2605.27,3134.52 v1(2605.27,3177.18) U24.6@2605.27,3224.74 ; U16.6@3837.81,884.67 v1(3837.81,932.24) 3837.81,974.89 C54.1@3838.48,975.56 ; C59.1@4020.58,3136 4021.25,3136.66 v1(4021.25,3179.32) U20.6@4021.25,3226.88 ; U7.3@4804.66,1104.99 4804.66,1172.28 C37.2@4804.16,1172.78 C38.2@4854.66,1172.78 ; v1(4904.66,767.16) R72.2@4904.66,787.78 ; v1(5202.96,944.81) U8.8@5202.96,892.39 5240,892.39 5252.96,879.43 C40.2@5252.96,819.78
  Top Layer w20: SW3.2@22.71,1983.07 28.21,1988.58 227.6,1988.58 229.02,1990 v1@230,1990 ; R127.2@5052.96,823.23 v1(5052.96,840.07)
  other v1: 670,450 715,450 760,450 805,450 670,491.64 715,491.64 760,491.64 805,491.64 995.68,878.49 2026.59,1003.89 2069.65,1003.89 3443.43,1008.75 3486.49,1008.75 4804.66,1145.61 706.61,1464.88 1032.6,1514.73 1084.97,1514.71 1054.25,1913.04 1054.25,1939.06 634.65,1967.44 230,1989 508.91,2077.09 1598.7,2229.28 2956.58,3100.67 2999.65,3100.67 4372.57,3102.81 4415.63,3102.81
5V: C13.2 C14.2 C15.2 C16.2 C17.2 C19.2 C39.2 C41.2 C42.2 C43.2 C44.2 C45.1 C50.1 C55.1 C60.1 D4.2 L1.2 LED6.2 LED7.2 LED8.2 LED9.2 LED10.2 R4.1 R5.2 R8.1 R60.2 R92.2 R97.2 R101.2 R106.2 R110.2 R115.2 R119.2 R124.2 TP2.1 U3.3 U5.5 U9.6 U13.6 U17.6 U21.6 | length 2477.5
  Top Layer w4: R4.1@1318.59,26.01 R4.1@1318.86,26.28
  Top Layer w15: R8.1@1.46,271 v1(38.99,271) ; C42.2@472.21,2910.56 472.21,3054.46 479.3,3061.55 LED7.2@479.3,3070.56 ; C44.2@472.21,3500.56 472.21,3644.46 479.3,3651.55 LED10.2@479.3,3660.56 ; v1(677.6,67.49) 662.18,67.49 647,52.31 647,-14 657,-24 TP2.1@718,-24 ; U5.5@873.18,1002.02 1026.98,1002.02 1059,970 v1(1059,660) ; C41.2@1019.34,2910.56 1019.34,3054.46 1026.43,3061.55 LED8.2@1026.43,3070.56 ; C43.2@1019.34,3500.56 1019.34,3644.46 1026.43,3651.55 LED9.2@1026.43,3660.56 ; R5.2@1231.46,26.28 R4.1@1318.86,26.28 ; v1(1318.59,0.7) R4.1@1318.59,26.01 ; R60.2@1566.58,2864.72 1566.58,2889.13 C39.2@1566.58,2910.01 ; 1566.58,2887.36 1566.58,3055.14 1573.79,3062.35 LED6.2@1573.79,3070.01 ; C60.1@1989.97,3502.48 2053.32,3502.48 2061.57,3494.23 U21.6@2061.57,3493.42 ; R119.2@2320.47,3574.85 v1(2349.82,3574.85) ; R97.2@2457.97,533.71 v1(2485.32,533.71) ; v1(2540.91,3574.85) R124.2@2568.27,3574.85 ; v1(2676.41,533.71) R92.2@2705.76,533.71 ; U9.6@2964.67,614.32 U9.6@2964.67,615.13 ; C55.1@3405.95,3504.62 3469.3,3504.62 3477.55,3496.37 U17.6@3477.55,3495.57 ; R110.2@3736.45,3577 v1(3765.8,3576.99) ; R106.2@3874.81,534.56 v1(3902.17,534.56) ; v1(3956.89,3576.99) R115.2@3984.25,3576.99 ; v1(4093.25,534.56) R101.2@4122.61,534.56 ; U13.6@4381.51,615.99 4381.51,615.18 4389.76,606.94 C45.1@4453.11,606.94
  Top Layer w25: v1(1950.08,3502.48) C60.1@1989.97,3502.48 ; U9.6@2964.67,614.32 2964.67,610.18 2967.91,606.94 C50.1@3036.27,606.94 ; v1(3036.27,533.71) C50.1@3036.27,606.08 ; v1(3366.06,3504.62) C55.1@3405.95,3504.62 ; v1(4453.11,534.56) C45.1@4453.11,606.94
  other v1: 632.6,67.49 632.6,109.13 677.6,109.13 1445,850 1490,850 1535,850 1580,850 1445,891.64 1490,891.64 1535,891.64 1580,891.64
24V: C10.2 C11.2 C12.2 C46.1 C51.1 C56.1 C61.1 D2.2 D14.1 D17.1 D20.1 D23.1 J1.3 J1.4 J1.5 J1.6 K1.1 K1.5 K2.1 K2.5 K3.1 K3.5 K4.1 K4.5 R2.1 R3.2 TP1.1 U2.2 U2.10 | length 1089.4
  Top Layer w20: C61.1@2063.79,2715.04 2063.8,2776.9 2178.79,2776.9 K4.1@2178.85,2776.84 ; 2847.38,1331.71 2847.44,1331.65 2962.44,1331.65 C46.1@2962.44,1393.51 ; C56.1@3479.78,2717.18 3479.78,2779.04 3594.77,2779.05 K3.1@3594.83,2778.99 ; 4264.23,1332.57 4264.29,1332.51 4379.28,1332.51 C51.1@4379.28,1394.37
  Top Layer w30: v1(1463.25,0.7) R3.2@1463.25,37.78
  Bottom Layer w15: v2(1338.14,240.48) 1428.52,240.48 1463.25,205.75 v1(1463.25,0.7)
  other v1: 1464.03,344.1 1559.03,344.1 1464.03,380.74 1514.03,380.74 1559.03,380.74 4742.08,1395.85 4787.08,1395.85 4832.08,1395.85 4877.08,1395.85 4742.08,1437.49 4787.08,1437.49 4832.08,1437.49 4877.08,1437.49 4742.08,1479.13 4787.08,1479.13 4832.08,1479.13 4877.08,1479.13 4742.51,1553.23 4787.51,1553.23 4832.51,1553.23 4877.51,1553.23 4742.51,1594.87 4787.51,1594.87 4832.51,1594.87 4877.51,1594.87 4742.51,1636.51 4787.51,1636.51 4832.51,1636.51 4877.51,1636.51 4742.94,1710.61 4787.94,1710.61 4832.94,1710.61 4877.94,1710.61 4742.94,1752.25 4787.94,1752.25 4832.94,1752.25 4877.94,1752.25 4742.94,1793.89 4787.94,1793.89 4832.94,1793.89 4877.94,1793.89 4743.37,1868 4788.37,1868 4833.37,1868 4878.37,1868 4743.37,1909.64 4788.37,1909.64 4833.37,1909.64 4878.37,1909.64 4743.37,1951.28 4788.37,1951.28 4833.37,1951.28 4878.37,1951.28
  other v2: 1162.69,240.48 1162.69,264.13 1338.14,264.13 1162.69,287.72 1338.14,287.72
485_DIN_1: R17.2 U8.4 | length 5648
  Top Layer w10: v1@489.3,1127.3 R17.2@489.3,1307.07
  Top Layer w15: v1@489,1127 v1@489.3,1127.3 ; v1(5026.17,1111.46) 5048.65,1111.46 5052.96,1107.14 U8.4@5052.96,1104.99
  Layer 2 w10: v1@490.39,1128.39 2507.1,1128.39 2571.82,1063.67 2571.82,685.54 2627.06,630.3 5013.03,630.3 5026.17,643.43 v1(5026.17,1111.46)
  other v1: 489,1128.39
485_ROUT_1: R15.2 U8.1 | length 6091.3
  Top Layer w10: v1@527.86,1104 R15.2@527.86,1307.07 ; U8.1@5202.96,1104.99 5202.96,1160.93 5214.81,1172.78 v1(5240,1172.78)
  Layer 2 w10: v1(526,1104) 2503.21,1104 2551.82,1055.39 2551.82,677.26 2618.78,610.3 5278.25,610.3 5296,628.05 5296,1149.32 5272.53,1172.78 v1(5240,1172.78)
ADC_PA3: D15.2 R19.2 R95.2 U10.4 | length 1762
  Top Layer w10: v1(608.58,1206.69) 608.77,1206.89 608.77,1306.75 R19.2@608.97,1306.95
  Top Layer w12: D15.2@2021.59,1169.32 R95.2@2091.55,1169.39 ; U10.4@2079.54,1103.05 U10.4@2081.02,1104.53 ; U10.4@2081.02,1104.57 2091.55,1115.1 R95.2@2091.55,1169.39 ; v1(2091.55,1206.69) R95.2@2091.55,1169.39
  Layer 2 w10: v1(608.58,1206.69) v1(2091.55,1206.69)
ADC_PA4: D18.2 R21.2 R104.2 U14.4 | length 3189.6
  Top Layer w10: v1(658,1254.89) 658,1306.21 R21.2@658.74,1306.94
  Top Layer w12: D18.2@3438.43,1170.25 R104.2@3508.39,1170.25 ; U14.4@3496.38,1103.91 U14.4@3497.86,1105.39 ; U14.4@3497.86,1105.43 3508.39,1115.96 R104.2@3508.39,1170.25 ; v1(3508.39,1215.52) R104.2@3508.39,1170.25
  Layer 2 w10: v1@658,1254.56 2514.4,1254.56 2532.84,1254.56 2641.56,1145.85 3483.69,1145.85 3508.39,1170.55 v1(3508.39,1215.52)
ADC_PA5: D21.2 R23.2 R113.2 U18.4 | length 6085.7
  Top Layer w10: v1(698.5,1279.89) R23.2@698.5,1306.94
  Top Layer w12: U18.4@4361.2,3006.13 4350.66,2995.6 R113.2@4350.66,2941.31 4350.66,2944.12 4353.66,2947.12 v1(4384.73,2947.12) 4414.88,2947.12 D21.2@4420.63,2941.38 ; U18.4@4361.2,3006.17 U18.4@4362.68,3007.65
  Top Layer w15: v1@698.5,1276.94 v1(698.5,1279.89)
  Layer 2 w10: v1(698.5,1279.89) 451.74,1279.89 401.2,1330.44 401.2,2929.18 418.77,2946.75 4384.36,2946.75 v1(4384.73,2947.12)
ADC_PA6: D24.2 R25.2 R122.2 U22.4 | length 5448.6
  Top Layer w10: v1(738.26,1279.89) R25.2@738.26,1306.94
  Top Layer w12: v1(2934.68,2882.15) R122.2@2934.68,2939.17 ; U22.4@2945.21,3003.99 2934.68,2993.46 R122.2@2934.68,2939.17 ; U22.4@2945.21,3004.03 U22.4@2946.69,3005.51 ; D24.2@3004.65,2939.17 R122.2@2934.68,2939.17
  Top Layer w15: v1@738.26,1276.94 v1(738.26,1279.89)
  Bottom Layer w10: v1(738.26,1279.89) 708.88,1309.28 75.68,1309.28 35,1349.96 35,2901.99 68.88,2935.87 2880.96,2935.87 v1(2934.68,2882.15)
AGND: C29.1 C30.1 D8.1 R12.2 U4.12 | length 151.9
  Top Layer w10: 360.78,1457.95 C29.1@360.78,1479.65 C30.1@360.79,1520.15 ; U4.12@601.5,1672.24 648.38,1672.24 ; 648.38,1672.2 656.83,1680.65 v1@656.83,1711.5
  other v1: 308.96,1473.15 308.96,1507.41 657.83,1711.5 657.83,1751.34
AVDD: C29.2 C30.2 D8.2 R11.1 U4.13
BOOT0: R58.2 SW3.1 U4.60 | length 959.3
  Top Layer w10: v1(759,1925) U4.60@758.98,1967.47
  Top Layer w20: SW3.1@23.28,2117.5 193.78,2117.5 193.85,2117.57 194.69,2117.57 v1@194.76,2117.5
  Bottom Layer w10: v1(195.52,2118.26) 195.52,1944.48 215,1925 v1(759,1925)
CAN1_N: D12.2 J6.5 J7.2 R80.2 | length 2080.2
  Top Layer w7: R80.2@4804.66,787.78 4808.16,787.78 4813.66,782.28 4813.66,782.09 4819.61,776.13 4819.61,699.88 4846.82,672.68 5285.19,672.68 5314,701.49 5314,963.81 5329.6,979.42 5352.55,979.42 5383.48,948.48 5383.48,944.81 5411.36,944.81 5417.93,938.25 5417.93,849.35 5404.21,835.64 5403.69,835.64 D12.2@5391.05,823 ; J6.5@4937.62,552.67 4947.75,552.67 4976.11,581.04 4976.11,611.97 4996.55,632.41 5350.33,632.41 5353.83,632.41 ccw(c5353.83,640.91) 5362.33,640.91 5362.33,662.39 cw(c5370.83,662.39) 5379.33,662.39 5379.33,640.91 ccw(c5387.83,640.91) 5396.33,640.91 5396.33,662.39 cw(c5404.83,662.39) 5413.33,662.39 5413.33,640.91 ccw(c5421.83,640.91) 5421.83,632.41 5454.06,632.41 5469.13,632.41 5480.69,643.97 5480.69,749.79 5424.06,806.42 5403.69,806.42 D12.2@5391.05,819.06
CAN1_P: D12.1 J6.4 R75.2 R81.2 | length 2088
  Top Layer w7: R75.2@4854.66,787.78 4851.16,787.78 4845.66,782.28 4845.66,781.93 4837.61,773.88 4837.61,707.34 4854.28,690.68 5277.73,690.68 5296,708.94 5296,971.27 5322.15,997.42 5406.88,997.42 5441.29,963.01 5467.19,963.01 R81.2@5478.49,951.7 5472.65,945.86 5442.78,945.86 5435.93,939 5435.93,851.83 5452.12,835.64 5453.21,835.64 D12.1@5465.85,823 ; J6.4@4987.62,452.67 4987.62,567.08 4994.11,573.58 4994.11,604.51 5004.01,614.41 5285.44,614.41 5371.5,614.41 5476.59,614.41 5498.69,636.51 5498.69,759.29 5461.47,796.52 5461.47,816.64 D12.1@5465.85,821.03
CAN1_RXD: R38.1 R79.1 | length 4345
  Top Layer w8: R79.1@4754.66,1209.78 R79.1@4754.71,1209.82
  Top Layer w10: R38.1@1292.03,1542.67 1293.19,1543.84 1383.84,1543.84 1397,1557 v1(1397,1603.81)
  Top Layer w15: R79.1@4754.71,1209.82 v1(4754.71,1230.45)
  Layer 2 w10: v1(1397,1603.81) 3989.13,1603.81 4036.74,1556.2 4036.74,1008.11 4060.54,984.31 4729.2,984.31 4754.71,1009.82 v1(4754.71,1230.45)
CAN1_SHDN: R57.2 R82.1 | length 6041.8
  Top Layer w10: v1@4709.64,584.23 R82.1@4709.66,787.78
  Top Layer w15: v1(257.85,1954.67) 360.45,1954.67 R57.2@361.01,1955.23
  Layer 2 w10: v1(257.85,1954.67) 257.85,1076.15 282.23,1051.77 2491.69,1051.77 2531.82,1011.65 2531.82,668.97 2616.57,584.22 v1(4709.63,584.22)
CAN1_STB: R18.1 R73.1 | length 4648.9
  Top Layer w10: v1@966.85,1182.13 R18.1@966.85,1306.94
  Top Layer w15: v1(4949.66,767.16) 4949.66,787.7 R73.1@4949.61,787.74
  Layer 2 w10: v1(967,1182.88) 2509.18,1182.88 2611.82,1080.24 2611.82,702.11 2643.63,670.3 4932.9,670.3 4949.66,687.06 v1(4949.66,767.16)
CAN1_TXD: R40.1 R74.1 | length 4466.1
  Top Layer w8: R74.1@4905.66,1209.78 R74.1@4905.71,1209.82
  Top Layer w10: R40.1@1292.03,1582.44 1294.89,1579.58 v1(1360,1579.58)
  Top Layer w15: R74.1@4905.71,1209.82 v1(4905.71,1230.45)
  Layer 2 w10: v1@1360,1580 3984.65,1580 4016.74,1547.92 4016.74,998.54 4050.97,964.31 4884.57,964.31 4905.71,985.45 v1(4905.71,1230.45)
DI_PC0: R44.2 U12.5 | length 3186.6
  Top Layer w10: v1(230.49,1679.62) R44.2@361.01,1679.62 ; U12.5@2470.97,884.66 2470.97,933.3 2480.71,943.04 v1(2503.32,943.04) v1@2505.83,943.04
  Layer 2 w10: v1(230.49,1679.62) 230.49,1072.71 271.43,1031.77 2474.45,1031.77 2503.32,1002.9 v1(2503.32,943.04)
DI_PC1: R45.2 U16.5 | length 4243.2
  Top Layer w10: v1(336.26,1639.86) R45.2@361.01,1639.86
  Top Layer w15: U16.5@3888,885.52 v1(3888,932.24)
  Layer 2 w10: v1(336.26,1639.86) 336.26,1253.24 359,1230.5 2528.62,1230.5 2634.01,1125.11 3866.46,1125.11 3888,1103.57 v1(3888,932.24)
DI_PC2: R46.2 U20.5 | length 5318.4
  Top Layer w10: v1(308.96,1600.09) R46.2@361.01,1600.09
  Top Layer w15: v1(3971.06,3179.32) U20.5@3971.06,3226.04
  Layer 2 w10: v1(308.96,1600.09) 308.96,2972.78 330.94,2994.75 3955.99,2994.75 3971.06,3009.82 v1(3971.06,3179.32)
DI_PC3: R48.2 U24.5 | length 3980.8
  Top Layer w10: v1(284.96,1560.33) R48.2@361.01,1560.33
  Top Layer w15: v1(2555.08,3177.18) U24.5@2555.08,3223.9
  Layer 2 w10: v1(284.96,1560.33) 284.96,2978.63 321.08,3014.75 2541.76,3014.75 2555.08,3028.07 v1(2555.08,3177.18)
DO_PA7: R27.2 R96.1 | length 2567.2
  Top Layer w10: v1(778,1279.89) R27.2@778.03,1306.94
  Top Layer w15: R96.1@3024.88,1370.34 3025.09,1370.55 3025.09,1398.04 v1(3025.3,1398.25)
  Layer 2 w10: v1(778,1279.89) 2535.79,1279.89 2648.6,1167.08 3002.1,1167.08 3025.86,1190.85 3025.86,1397.69 v1(3025.3,1398.25)
DO_PA8: R29.2 R105.1 | length 3890.2
  Top Layer w10: R29.2@1292.03,1781.26 1356.26,1781.26 1371,1796 1371,2001.94 1358.94,2014 v1(1332,2014) ; v1(4306.31,1507.02) 4420.33,1507.02 4442.14,1485.21 4442.14,1371.61 R105.1@4441.82,1371.3 R105.1@4441.72,1371.19
  Layer 2 w10: v1(1332,2014) 3990.24,2014 4306.31,1697.94 v1(4306.31,1507.02)
DO_PB1: R16.1 R87.1 U8.2 U8.3 | length 5439.5
  Top Layer w10: v1@926.38,1159.69 R16.1@926.38,1306.51 ; v1(4994.99,1172.78) R87.1@5152.96,1172.78
  Top Layer w15: U8.3@5102.96,1104.99 5105.31,1102.63 5150.61,1102.63 U8.2@5152.96,1104.99 R87.1@5152.96,1172.78
  Layer 2 w10: v1(927,1159.07) 2504.7,1159.07 2591.82,1071.96 2591.82,693.83 2635.34,650.3 4981.74,650.3 4995,663.56 v1(4994.99,1172.78)
DO_PB6: R26.1 R103.1 | length 5062.3
  Top Layer w10: v1(577.88,2194.81) 577.88,2297.98 589.9,2310 717.87,2310 727.87,2300 R26.1@727.87,2205.24 ; R103.1@4157.82,1159.35 4161.32,1159.35 4196.78,1194.81 v1(4355.71,1194.81)
  Layer 2 w10: v1@578.79,2193.89 1025.41,2193.89 1161.18,2058.13 4007.87,2058.13 4355.71,1710.29 v1(4355.71,1194.81)
DO_PB7: R28.1 R112.1 | length 3728.7
  Top Layer w10: R28.1@688.51,2205.24 v1(688.51,2278)
  Top Layer w15: v1@3701.23,2917.96 R112.1@3701.23,2952.2
  Layer 2 w10: v1(688.51,2278) 862.13,2278 875.02,2290.89 875.02,2874.87 922.38,2922.23 v1(3701.23,2922.23)
DO_PB8: R30.1 R121.1 | length 2348.1
  Top Layer w10: R30.1@648.35,2205.24 v1(648.35,2254)
  Top Layer w15: v1(2285.25,2897.96) R121.1@2285.25,2950.06
  Layer 2 w10: v1(648.35,2254) 876.52,2254 902.25,2279.73 902.25,2866.22 933.99,2897.96 v1(2285.25,2897.96)
DO_PC10: R54.2 R114.1 | length 2935.5
  Top Layer w15: R54.2@1006.22,2205.25 v1(1006.22,2230) ; v1@3417.13,2614.43 3417.13,2740.15 R114.1@3417.23,2740.26 R114.1@3417.34,2740.36
  Layer 2 w10: v1(1006.22,2230) 1006.22,2596.7 1023.95,2614.43 v1(3416.92,2614.43)
DO_PC11: R55.2 R123.1 | length 1643.1
  Top Layer w15: R55.2@966.46,2205.24 v1(966.46,2230) ; R123.1@1910.45,2760.99 1910.55,2761.09 v1(1910.55,2837.64)
  Layer 2 w10: v1(966.46,2230) 966.46,2820.39 983.7,2837.64 v1(1910.55,2837.64)
DO_PD2: R47.1 R94.1 | length 3775.4
  Top Layer w15: R47.1@886.93,2205.24 v1(886.93,2230) ; R94.1@2740.98,1158.5 v1(2740.98,1191.02)
  Layer 2 w10: v1@886.93,2229.85 442.62,2229.85 424.48,2211.71 424.48,1343.05 463.35,1304.19 2539.79,1304.19 2652.95,1191.02 v1(2740.98,1191.02)
GND: C1.2 C2.2 C3.2 C4.1 C5.1 C6.1 C7.1 C10.1 C11.1 C12.1 C13.1 C14.1 C15.1 C16.1 C18.1 C19.1 C20.1 C21.2 C22.2 C23.1 C24.1 C25.1 C26.1 C27.1 C28.1 C31.1 C32.1 C33.1 C34.1 C35.1 C36.2 C37.1 C38.1 C39.1 C40.1 C41.1 C42.1 C43.1 C44.1 C45.2 C46.2 C47.2 C49.2 C50.2 C51.2 C52.2 C54.2 C55.2 C56.2 C57.2 C59.2 C60.2 C61.2 C62.2 C64.2 D2.1 D3.2 D4.1 D5.1 D6.1 D7.1 D9.1 D10.2 D11.2 D12.3 D13.3 D15.1 D18.1 D21.1 D24.1 J2.2 J3.3 J4.5 J5.A1 J5.A12 J5.B1 J5.B12 LED1.2 LED2.2 LED3.2 LED6.3 LED7.3 LED8.3 LED9.3 LED10.3 Q3.1 Q4.2 Q5.2 Q6.2 Q7.2 R6.1 R7.1 R12.1 R58.1 R68.1 R69.1 R70.2 R71.2 R77.1 R78.1 R83.1 R87.2 R93.1 R98.1 R99.1 R102.1 R107.1 R108.1 R111.1 R116.1 R117.1 R120.1 R125.1 R126.1 R128.2 SW1.2 SW2.4 SW2.5 SW2.6 U1.2 U2.1 U2.6 U2.11 U2.13 U3.6 U3.7 U4.18 U4.31 U4.47 U4.63 U5.2 U6.2 U7.2 U8.5 U9.3 U9.4 U10.2 U11.2 U11.3 U12.4 U13.3 U13.4 U14.2 U15.2 U15.3 U16.4 U17.3 U17.4 U18.2 U19.2 U19.3 U20.4 U21.3 U21.4 U22.2 U23.2 U23.3 U24.4 X1.2 X1.4 | length 7932.6
  Top Layer w4: C28.1@574.05,2055.77 C28.1@577.88,2059.59 ; U5.2@765.04,958.84 U5.2@770.82,964.62 ; D6.1@1105.06,1434.21 D6.1@1106.01,1435.16
  Top Layer w7: 991.06,1432.21 D6.1@1105.06,1432.21
  Top Layer w8: C31.1@107.2,1689.31 C31.1@107.2,1689.31 ; D9.1@124.41,1618.48 v1(158.9,1618.48) ; C21.2@992.79,1422.59 C27.1@1032.6,1422.59 ; R93.1@2069.65,913.94 R93.1@2078.2,905.39 ; R120.1@2948.03,3203.17 R120.1@2956.58,3194.62 ; R102.1@3486.49,914.8 R102.1@3495.04,906.25 ; R111.1@4364.02,3205.31 R111.1@4372.57,3196.76 ; R78.1@4621,824.78 R78.1@4621,824.78 ; R77.1@4666,824.78 R77.1@4666,824.78 ; R83.1@4754.66,787.78 R83.1@4754.71,787.82 ; C37.1@4804.12,1209.73 C37.1@4804.16,1209.78 ; C38.1@4854.62,1209.74 C38.1@4854.66,1209.78 ; R87.2@5152.92,1209.74 R87.2@5152.96,1209.78 ; D13.3@5599.96,733.29 D13.3@5600,733.33
  Top Layer w10: SW1.2@22.71,1718.43 29.91,1711.23 v1@107.2,1711.23 ; C33.1@448.39,1726.87 471.72,1726.87 v1@473.45,1725.14 ; D7.1@545.92,2055.04 545.92,2061.38 ; 551.53,2055.77 574.05,2055.77 668.32,2055.77 C22.2@672.14,2059.59 ; 599.53,4001.32 599.53,4100.78 ; v1(699.86,1869.05) U4.63@699.92,1967.47 ; U4.18@699.92,1514.71 699.92,1567.86 v1(719.61,1587.55) ; v1@945.05,1869.05 U4.47@1054.25,1869.05 U4.47@1053.73,1868.52 ; U4.31@955.83,1514.71 v1(955.79,1559.35) ; C23.1@1072.47,1422.59 1106.01,1422.59 D6.1@1106.01,1432.77 ; v1(1173.72,2257.29) 1174.57,2258.15 1213.74,2258.15 D10.2@1214.6,2259 ; R128.2@5202.96,819.78 R128.2@5210.46,815.78 ; C40.1@5245.46,786.78 C40.1@5247.97,785.12 ; 432.21,4001.32 515.87,4001.32 ; 432.21,4001.32 348.55,4001.32 348.55,4100.78 432.21,4100.78 ; 432.21,4001.32 432.21,4100.78 ; 432.21,4100.78 515.87,4100.78 ; 515.87,4001.32 515.87,4100.78 ; 515.87,4001.32 683.2,4001.32 683.2,4100.78 599.53,4100.78 ; 515.87,4100.78 599.53,4100.78
  Top Layer w13.21: R58.1@110,2076.5 110,2037.5 120.85,2026.65 v1@230.49,2026.65 ; v1(5309.26,2044) C5.1@5309.26,2077.08 ; v1(5378.26,2044) C6.1@5378.26,2082.08 ; D2.1@5434.27,2002.95 C7.1@5434.27,2082.07
  Top Layer w15: C31.1@107.2,1689.31 v1(107.2,1709.93) ; v1(377.15,1265) 397.92,1285.77 R12.1@397.92,1374.09 ; v1@380,-9.23 382.33,-9.23 398.3,-25.19 C20.1@456.84,-25.19 C19.1@566,-25.19 ; LED7.3@428.12,3070.56 435.36,3063.33 C42.1@435.36,2910.71 ; LED10.3@428.12,3660.56 435.36,3653.33 C44.1@435.36,3500.71 ; v1(734.33,958.84) 735.98,960.49 766.69,960.49 U5.2@770.82,964.62 ; LED8.3@975.25,3070.56 982.48,3063.33 C41.1@982.48,2910.71 ; LED9.3@975.25,3660.56 982.48,3653.33 C43.1@982.48,3500.71 ; v1@1064.36,26.28 1108.36,26.28 C18.1@1114.86,32.78 1119.98,27.65 1151.67,27.65 v1(1153.32,26) 1153.46,26.14 1186.32,26.14 R7.1@1186.45,26.28 ; C25.1@1137.94,1939.06 1138.05,1939.16 1138.05,1966.83 v1(1138.15,1966.94) ; C12.1@1416.89,220 1606,220 1610.15,220 1632.65,197.5 v1(1632.65,139.42) ; LED6.3@1522.61,3070.01 1522.61,3062.35 1529.58,3055.38 C39.1@1529.58,2910.01 ; v1(1957.84,2696.07) 1958.05,2696.28 1958.05,2723.78 R125.1@1958.26,2723.99 ; v1@1989.6,1076.28 1989.74,1076.28 1992.41,1078.96 1992.41,1081.22 1993.58,1082.38 1997,1078.96 2020.09,1078.96 C47.2@2021.59,1077.46 ; Q7.2@1997.84,2820.65 Q7.2@1997.94,2820.54 1998.05,2820.44 2025.54,2820.44 v1(2025.75,2820.23) ; 2021.59,1226.41 D15.1@2021.59,1252 ; C61.2@2063.79,2655.04 2064.32,2654.52 2105.48,2654.52 v1(2106,2654) ; U10.2@2154.32,1077.44 2183.41,1077.44 v1(2184.45,1076.4) ; C49.2@2420.97,1034.71 v1(2420.97,1076.4) ; v1(2605.26,3038.62) C64.2@2605.26,3073.86 ; v1(2841.79,3031.1) U22.2@2878.78,3031.1 ; v1(2918.93,1454.18) 2919.02,1454.28 2962.18,1454.28 C46.2@2962.28,1454.38 ; C46.2@2962.28,1453.51 C46.2@2962.44,1453.51 ; v1(3000.48,1288.33) 3000.69,1288.12 3028.19,1288.12 Q4.2@3028.29,1288.01 Q4.2@3028.4,1287.91 ; D24.1@3004.65,2856.56 v1(3004.65,2882.15) ; 3004.65,3010.56 C62.2@3004.65,3031.1 ; R98.1@3067.98,1370.44 3068.19,1370.65 3068.19,1398.15 v1(3068.4,1398.36) ; v1(3373.82,2712.33) 3374.03,2712.54 3374.03,2740.04 R116.1@3374.24,2740.25 ; Q6.2@3413.82,2822.79 Q6.2@3413.92,2822.68 3414.03,2822.58 3441.53,2822.58 v1(3441.74,2822.37) ; C52.2@3438.43,1078.32 v1(3438.43,1101.3) ; v1(3438.43,1227.27) D18.1@3438.43,1252.86 ; v1(3479.78,2614.43) C56.2@3479.78,2657.18 ; U14.2@3564.29,1078.32 v1(3601.29,1078.32) ; C54.2@3837.81,1035.56 v1(3837.81,1070.79) ; v1(4021.25,3040.76) C59.2@4021.25,3076 ; v1(4257.77,3033.24) U18.2@4294.76,3033.24 ; v1(4306.31,1454.7) 4306.47,1454.54 4379.12,1454.54 C51.2@4379.28,1454.37 ; v1(4417.32,1289.19) 4417.53,1288.98 4445.03,1288.98 Q5.2@4445.14,1288.87 Q5.2@4445.24,1288.77 ; D21.1@4420.63,2858.7 v1(4420.63,2884.29) ; v1(4420.63,3007.65) C57.2@4420.63,3033.24 ; R107.1@4484.82,1371.3 4485.03,1371.51 4485.03,1399.01 v1(4485.24,1399.22) ; R78.1@4621,824.78 v1(4621,845.4) ; R77.1@4666,824.78 v1(4666,845.4) ; v1(4754.66,767.16) R83.1@4754.66,787.78 ; C37.1@4804.16,1209.78 v1(4804.16,1230.4) ; C38.1@4854.66,1209.78 v1(4854.66,1230.4) ; R87.2@5152.96,1209.78 v1(5152.96,1230.4) ; v1(5428.45,712.52) D12.3@5428.45,733.14 ; v1(5599.96,712.67) D13.3@5599.96,733.29
  Top Layer w20: X1.4@411,1796.43 X1.4@420.58,1806 ; X1.4@420.58,1804 436.75,1804 ; R93.1@2069.65,913.94 v1(2069.65,961.89) v1@2069.65,962.89 ; v1@2956.58,3145.67 v1(2956.58,3146.67) R120.1@2956.58,3194.62 ; R102.1@3486.49,914.8 v1(3486.49,962.75) v1@3486.49,963.75 ; v1@4372.57,3147.81 v1(4372.57,3148.81) R111.1@4372.57,3196.76 ; R128.2@5202.96,823.22 v1(5202.96,840.06)